# Altium PCB PCB.PcbDoc (part 1 of 3)
Units mm, origin at the board's own origin, x right, y up, seen from the top; angles counter-clockwise.
Board outline 35.13 x 75.01 mm, 4 copper layers (Top Layer, GND_Signal_1, Signal_1, Bottom Layer), stack 1.707 mm thick; 130 components, 99 nets, 648 pads, 871 vias.
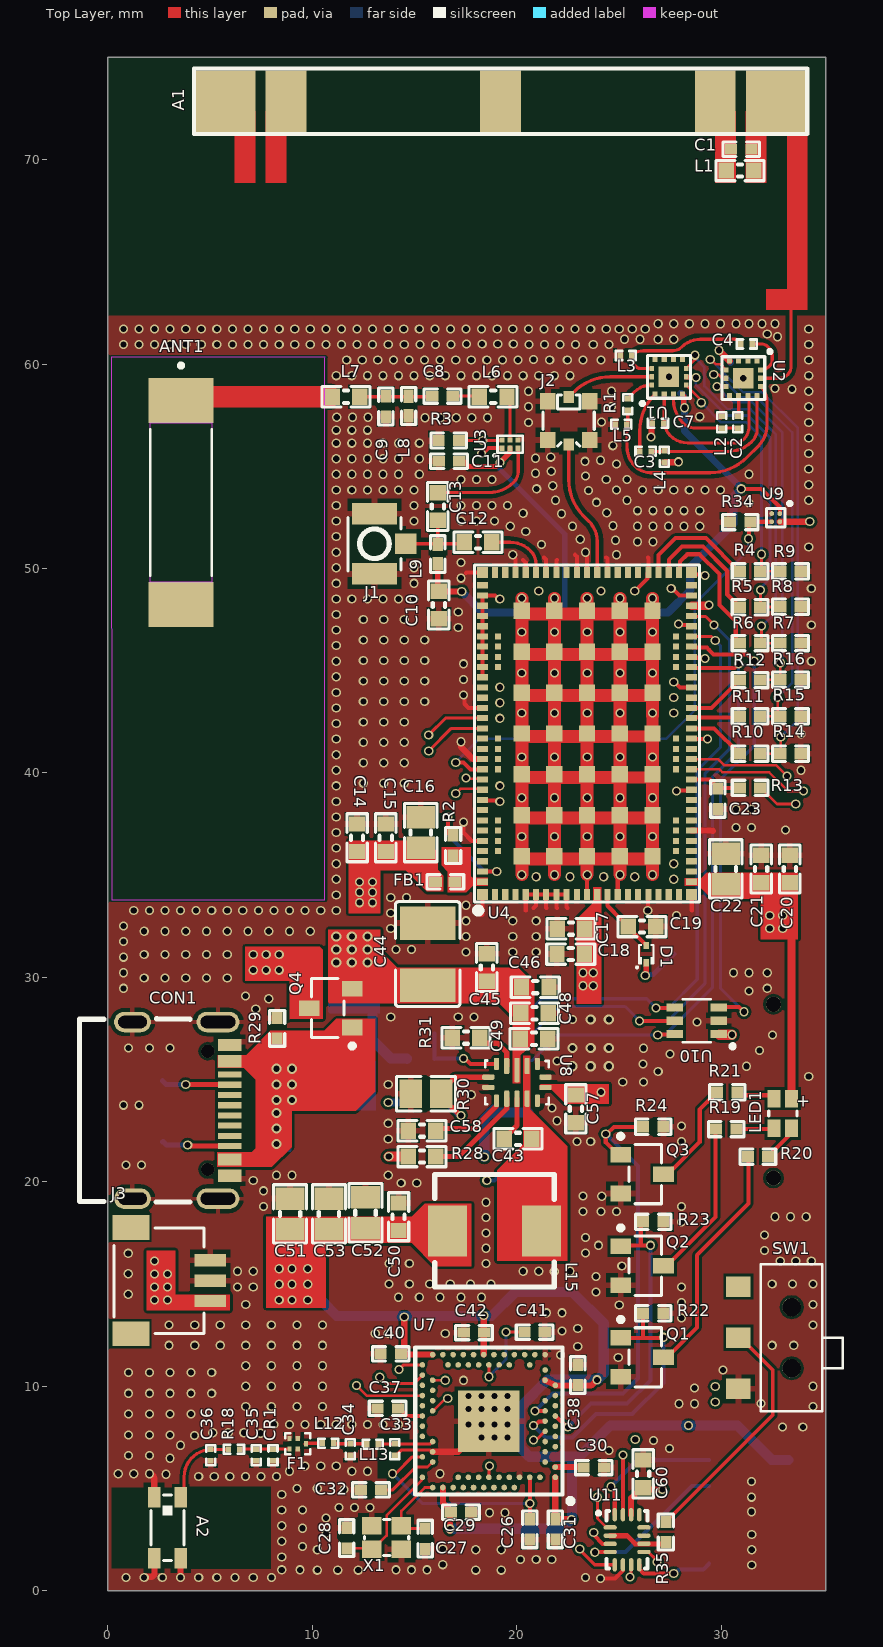
[diagram p0: Top Layer view]
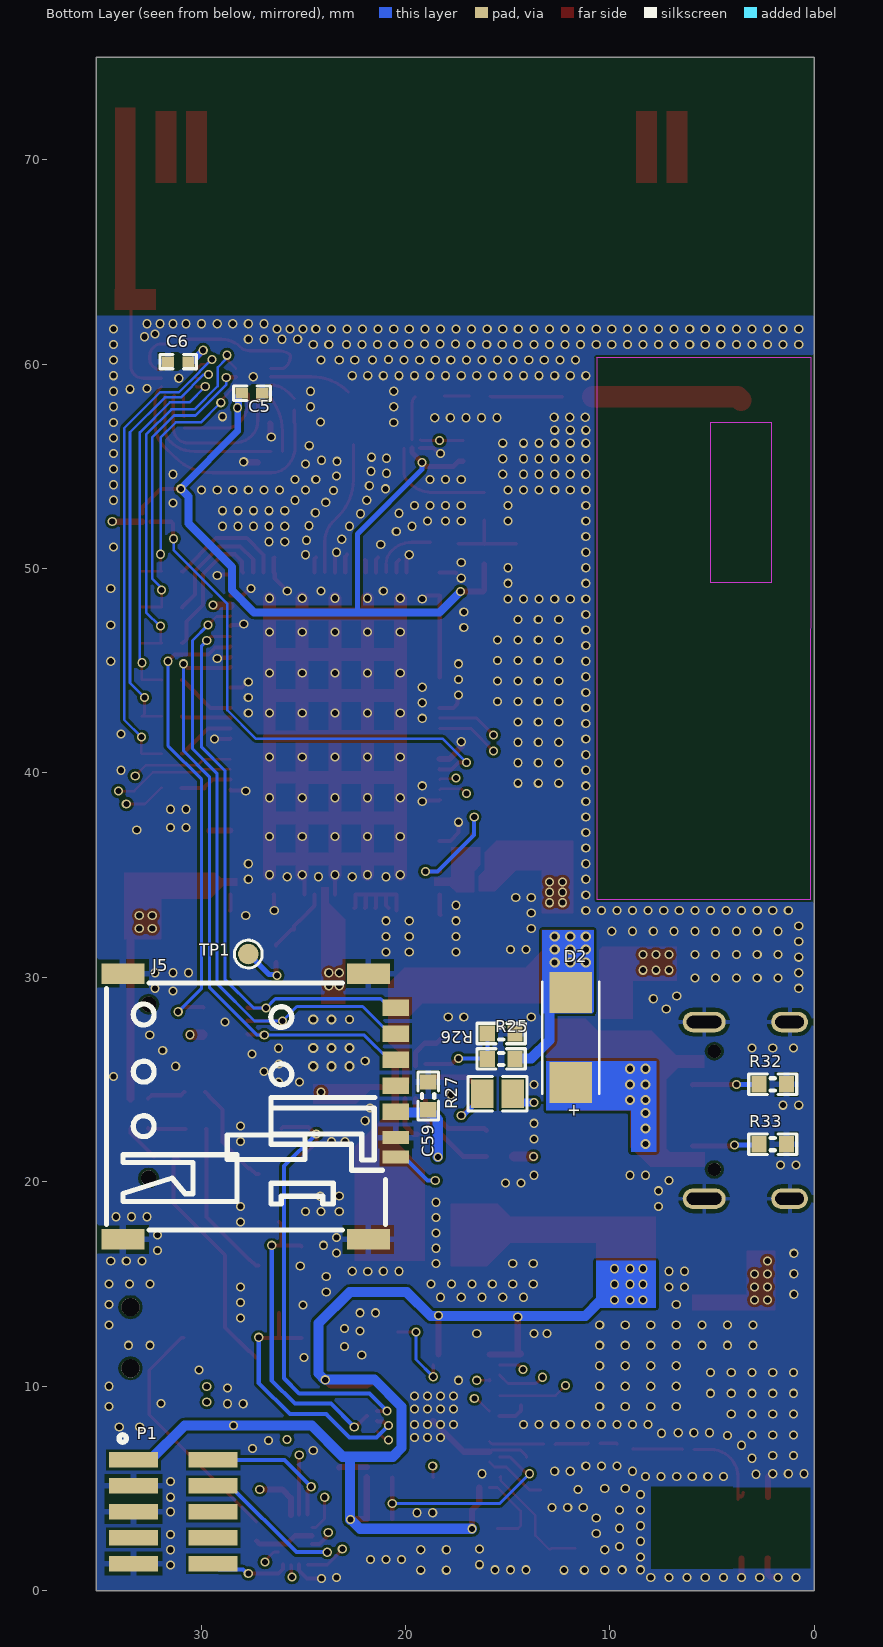
[diagram p1: Bottom Layer view, seen from below]
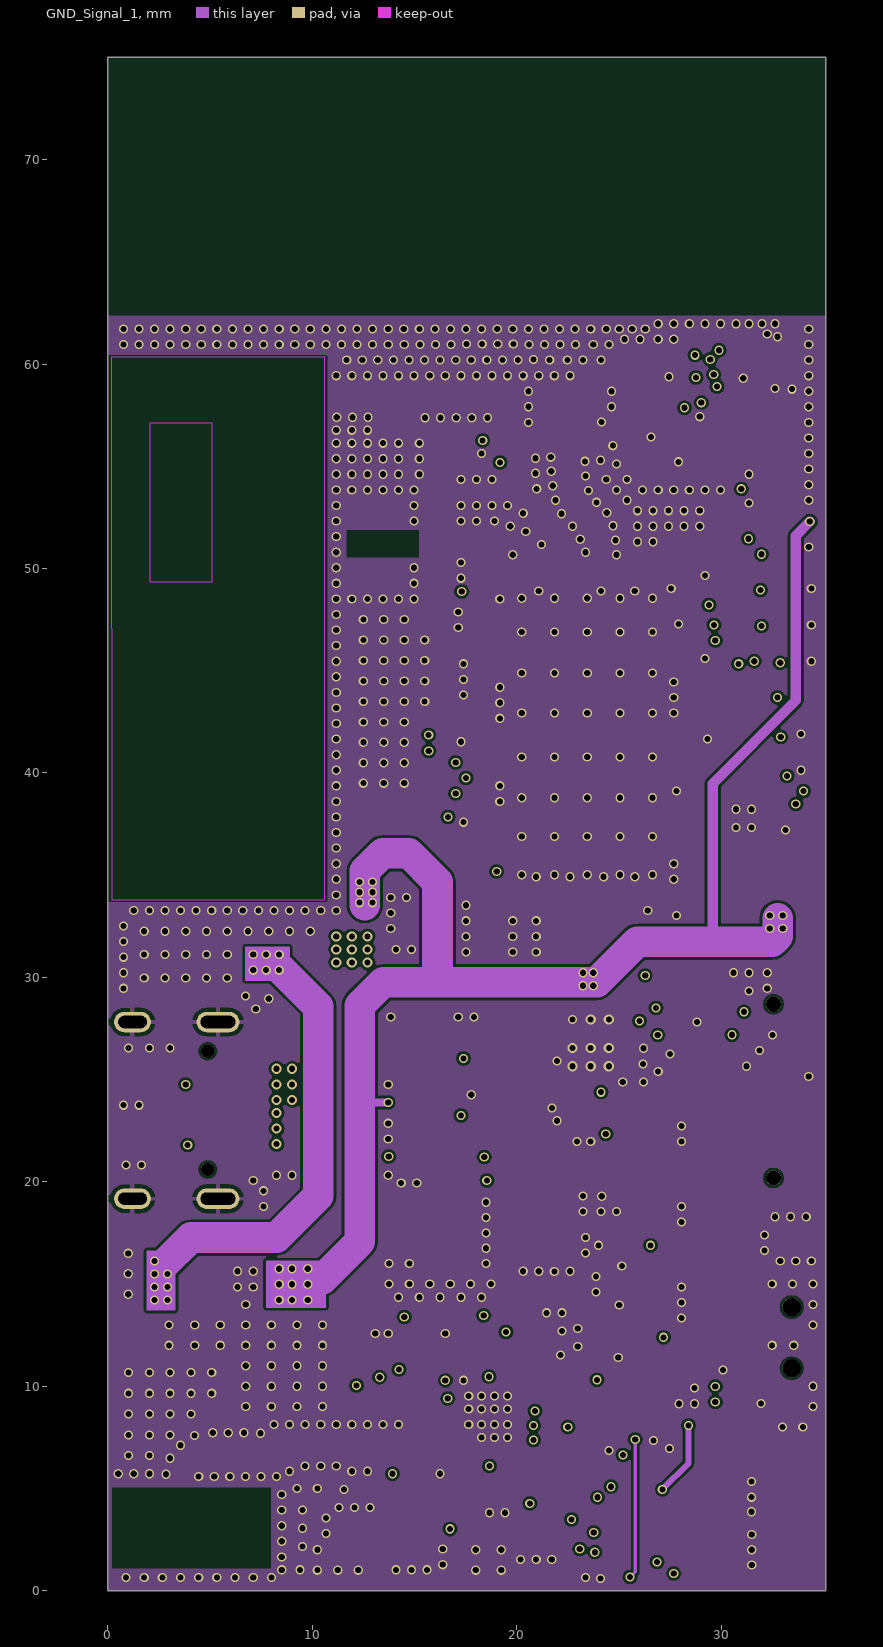
[diagram p2: GND_Signal_1]
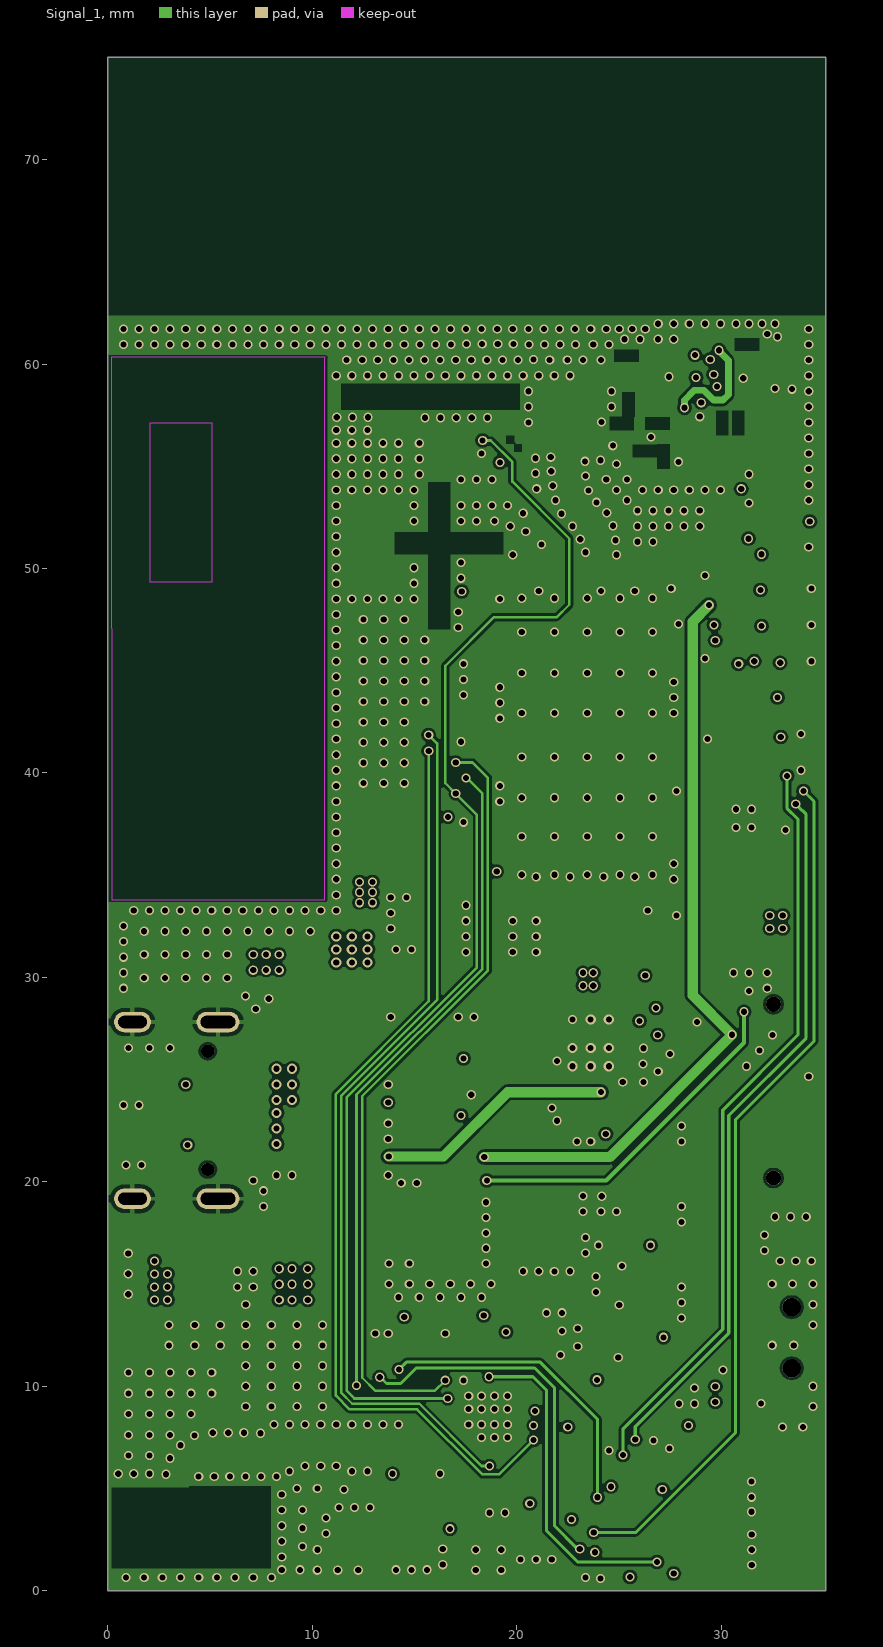
[diagram p3: Signal_1]
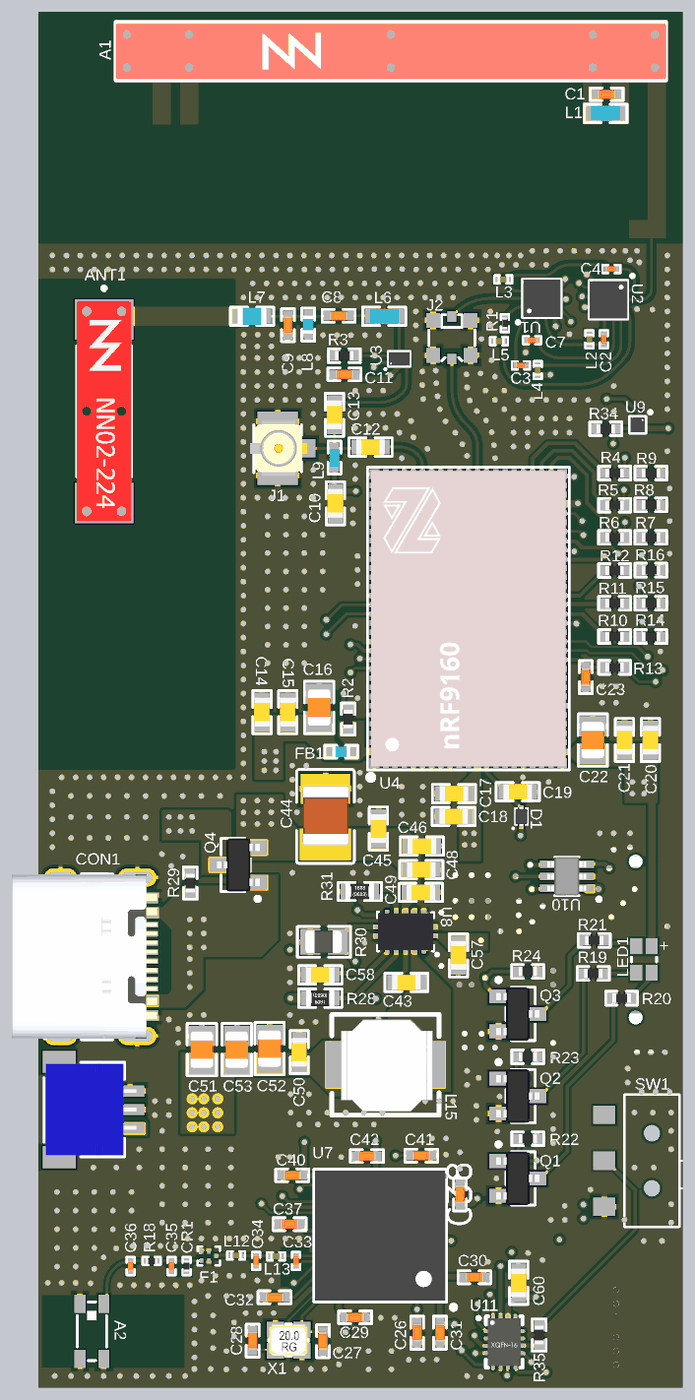
[diagram p5: 3D render of the assembled board from above, using the file's embedded part models]
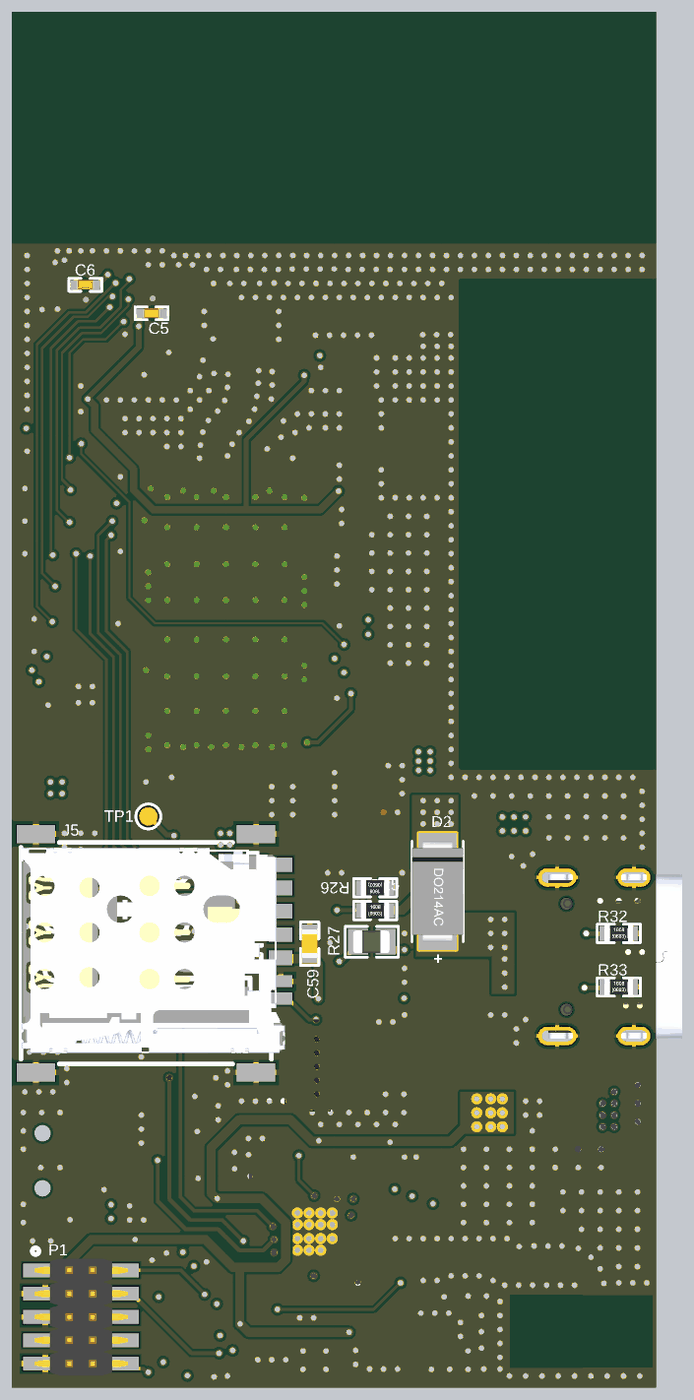
[diagram p6: 3D render of the assembled board from below, using the file's embedded part models]

## Layer stack, top to bottom
Top Solder: solder mask 0.0475, Solder Resist, Dk 3.5
Top Layer: signal copper 0.018
Dielectric 3: prepreg 0.1, Dk 4.2
GND_Signal_1: signal copper 0.0152
Dielectric1: dielectric 0.32, FR-4, Dk 4.8
Signal_1: signal copper 0.0356
Dielectric 1: prepreg 1.2, PP-006, Dk 4.1
Bottom Layer: signal copper 0.018
Bottom Solder: solder mask 0.0475, Solder Resist, Dk 3.5

## Board outline
0,0 0,28.473 0,75.006 35.128,75.006 35.128,0

## Design rules (kind name [scope] priority, off if disabled: settings)
Clearance Polygon_Clearance [InNet('GPS_LNA_IN') or InNet('LTE_RF') or InNet('GPS_RF1') or InNet('T1F') or InNet('T2F')  or InNet('T3F') or InNet('T4F') or InNet('T5F') or InNet('T1A') or InNet('T2A') or InNet('T4A') or InNet('T5A') or InNet('ANT_LTE') or InNet('ANT_GPS') or InNet('GPS_RF3') or InNet('GPS_RF2') or InNet('LTE_RF1')] p1: gap=0.12 ignorepadtopadclearanceinfootprint=FALSE except(0.206: Arc-Fill Arc-Poly Arc-Region Track-Fill Track-Poly Track-Region SMDPad-Fill SMDPad-Poly SMDPad-Region THPad-Fill THPad-Poly THPad-Region Via-Fill Via-Poly Via-Region Fill-Fill Fill-Poly Fill-Region Poly-Poly Poly-Region Region-Region)
Clearance ANT_Clerance [InNet('LTE_RF1') or InNet('LTE_RF') or InNet('T1F') or InNet('T2F') or InNet('T3F') or InNet('T4F') or InNet('T5F') or InNet('T6F') or InNet('T1A') or InNet('T2A') or InNet('T3A') or InNet('T4A') or InNet('T5A') or InNet('T6A') or InNet('T7A') or InNet('ANT_GPS') or InNet('GPS_RF') or InNet('ANT_LTE')  or InNet('LTE_RF') or InNet('BLE_RF') or InNet('nRF52_ANT') or InNet('BLE_ANT') or InNet('GPS_LNA') or InNet('GPS_LNA_IN') vs (InNamedPolygon('Top_Layer-GND')) or (InNamedPolygon('Bottom_Layer-GND'))] p2: gap=0.23 ignorepadtopadclearanceinfootprint=FALSE
Clearance [All] p3: gap=0.125 ignorepadtopadclearanceinfootprint=FALSE except(0.12: Arc-Arc Arc-Track Track-Track)
Clearance "Keepout clearance" [All vs OnLayer('Keep-Out Layer')] p4: gap=0.2 ignorepadtopadclearanceinfootprint=FALSE
ComponentClearance [All] p1 off: gap=0.254 collisioncheckmode=3 verticalgap=0.254 showdistances=FALSE
DiffPairsRouting [All] p1: maxlimit=0.254 minlimit=0.004 mostfreqgap=0.193 toplayer_minwidth=0.15 toplayer_maxwidth=0.165 toplayer_prefwidth=0.165 midlayer1_minwidth=0.15 midlayer1_maxwidth=0.165 midlayer1_prefwidth=0.165 midlayer2_mingap=0.191 midlayer2_minwidth=0.165 midlayer2_maxwidth=0.165 midlayer2_prefwidth=0.165 bottomlayer_mingap=0.191 bottomlayer_minwidth=0.165 bottomlayer_maxwidth=0.165 bottomlayer_prefwidth=0.165 maxuncoupledlength=12.7
FabricationTestPointUsage TestPointUsage [All] p1: valid=0 allowmultiple=FALSE
FabricationTestpoint Testpoint [All] p1: side=3 testpointundercomponent=TRUE minsize=1.016 maxsize=2.54 preferedsize=1.524 minholesize=0 maxholesize=1.016 preferedholesize=0.813 testpointgrid=0.025 allowsidetop=TRUE allowsidebottom=TRUE usegrid=TRUE gridtolerance=0
Height [All] p1 off: minheight=0 maxheight=25.4 prefheight=12.7
HoleSize [All] p1: absolutevalues=TRUE maxlimit=5 minlimit=0.1 maxpercent=80.000 minpercent=20.000
MinimumAnnularRing [All] p1 off: minimumring=0.152
NetAntennae NetAntennae_ANT [InNet('ANT')] p1: netantennaetolerance=40
NetAntennae [All] p2: netantennaetolerance=0
PlaneClearance [All] p1: clearance=0.4
PolygonConnect [InNet('GND')] p1: thpad.connectstyle=Relief thpad.reliefconductorwidth=0.2 thpad.reliefentries=4 thpad.polygonreliefangle="90 Angle" thpad.airgapwidth=0.2 smdpad.connectstyle=Relief smdpad.reliefconductorwidth=0.3 smdpad.reliefentries=4 smdpad.polygonreliefangle="90 Angle" smdpad.airgapwidth=0.2 via.connectstyle=Direct via.reliefconductorwidth=0.254 via.reliefentries=4 via.polygonreliefangle="90 Angle" via.airgapwidth=0.254
PolygonConnect PolygonConnect_1 [InNet('+3V3') vs InNet('+3V3')] p2: connectstyle=Direct reliefconductorwidth=0.254 reliefentries=4 polygonreliefangle="90 Angle" airgapwidth=0.254
RoutingVias [All] p1: holewidth=0.3 width=0.45 viastyle="Through Hole" minholewidth=0.2 minwidth=0.25 maxholewidth=0.4 maxwidth=0.5
ShortCircuit ShortCircuit_AGND/GND [InNet('AGND') vs InNet('GND')] p1: allowed=TRUE
ShortCircuit [All] p2: allowed=FALSE
SilkToSolderMaskClearance SilkscreenOverComponentPads [IsPad] p1: minsilkscreentomaskgap=0.254 clearancetoexposedcopper=TRUE
SolderMaskExpansion SolderMaskExpansion_1 [IsVia] p1: expansion=0.102
SolderMaskExpansion [All] p2: expansion=0.076
UnpouredPolygon [All] p1 off:
Width Width_Diff [(InDifferentialPairClass('All Differential Pairs'))] p1: maxlimit=0.165 minlimit=0.165 preferedwidth=0.165
Width [All] p2: maxlimit=10.16 minlimit=0.125 preferedwidth=0.152 minimp=50.000000 maximp=50.000000 favimp=50.000000
19 further rules are at their usual default settings.

## Classes and differential pairs
component class "Power Input Solar, Battery": C43 C44 C45 C46 C48 C49 C50 C51 C52 C53 C57 C58 CON1 D2 J3 L15 Q4 R25 R26 R27 R28 R29 R30 R31 R32 R33 R34 U8 U9
component class "SWD and SIM Connector": C59 C60 J5 P1 R35 SW1 U10 U11
component class "MCU NRF9160 Cellular GPS": A1 ANT1 C1 C2 C3 C4 C5 C6 C7 C8 C9 C10 C11 C12 C13 C14 C15 C16 C17 C18 C19 C20 C21 C22 C23 D1 FB1 J1 J2 L1 L2 L3 L4 L5 L6 L7 L8 L9 R1 R2 R3 R4 R5 R6 R7 R8 R9 R10 R11 R12 R13 R14 R15 R16 TP1 U1 U2 U3 U4
component class RGB: LED1 Q1 Q2 Q3 R19 R20 R21 R22 R23 R24

## Components (designator, comment, footprint, x,y, rotation, side; value= is the part's Value field where it differs from the comment)
A1 "NN03-310" FR01-S4-210_DF 19.217,72.863 r0 top value=FR01-S4-210
A2 "2450AT18D0100" 2450AT18D0100_STD-R 2.919,3.076 r90 top
ANT1 "NN02-224" ANT-NN02-224 3.581,58.231 r270 top
C1 "0.5pF" CAPC1005X04L 30.986,70.514 r180 top locked
C2 "2.5pF" CAPC0603X03L_C 30.826,57.154 r270 top
C3 "5.5pF" CAPC0603X03L_C 26.305,55.732 r180 top
C4 "9.2pF" CAPC0603X03L_C 31.248,60.985 r180 top
C5 "2.2nF" CAPC1005X04L 27.508,58.572 r180 bottom
C6 "2.2nF" CAPC1005X04L 31.115,60.122 r0 bottom
C7 "1.5pF" CAPC0603X03L_C 26.915,57.103 r180 top
C8 "1nF" CAPC1005X04L 16.37,58.434 r180 top locked
C9 "3.7pF" CAPC1005X04L 13.607,57.926 r270 top locked
C10 "39pF" CAPC1608X06L_3 16.196,48.213 r90 top
C11 "33nF" CAPC1005X04L 16.688,55.245 r0 top
C12 "39pF" CAPC1608X06L_3 18.11,51.283 r180 top
C13 "39pF" CAPC1608X06L_3 16.145,53.039 r90 top
C14 "15pF" CAPC1608X06L_3 12.192,36.83 r90 top
C15 "100nF" CAPC1608X06L_3 13.599,36.83 r90 top
C16 "47uF" CAPC2012X11L 15.305,37.084 r90 top
C17 "100nF" CAPC1608X06L_3 22.657,32.385 r180 top
C18 "4.7uF" CAPC1608X06L_3 22.646,31.14 r180 top
C19 "4.7uF" CAPC1608X06L_3 26.137,32.487 r0 top
C20 "15pF" CAPC1608X06L_3 33.367,35.306 r90 top
C21 "100nF" CAPC1608X06L_3 31.96,35.306 r90 top
C22 "47uF" CAPC2012X11L 30.226,35.306 r90 top
C23 "100nF/16V" CAPC1005X04L 29.845,38.735 r270 top
C26 "1uF" CAPC1005X04L 20.65,2.997 r270 top
C27 "12pF" CAPC1005X04L 15.519,2.54 r270 top
C28 "12pF" CAPC1005X04L 11.684,2.565 r90 top
C29 "100nF" CAPC1005X04L 17.272,3.835 r0 top
C30 "100nF" CAPC1005X04L 23.774,6.02 r0 top
C31 "1uF" CAPC1005X04L 21.895,2.997 r270 top
C32 "100pF" CAPC1005X04L 12.878,4.928 r180 top
C33 "1.0pF" CAPC0603X03L_C 14.046,6.909 r90 top
C34 "1.2pF" CAPC0603X03L_C 11.868,6.909 r90 top value=1.0pF
C35 "DNP" CAPC0603X03L_C 7.261,6.629 r90 top
C36 "DNP" CAPC0603X03L_C 5.029,6.629 r90 top
C37 "820pF" CAPC1005X04L 13.691,8.915 r180 top
C38 "4.7uF" CAPC1005X04L 22.987,10.541 r90 top
C40 "100nF" CAPC1005X04L 13.843,11.582 r180 top
C41 "100nF" CAPC1005X04L 20.879,12.649 r0 top
C42 "100nF" CAPC1005X04L 17.907,12.624 r180 top
C43 "220nF" CAPC1608X06L_3 20.066,22.098 r0 top
C44 "100uF" CAPC3225CX04L 15.748,31.242 r270 top
C45 "10uF" CAPC1608X06L_3 18.542,30.48 r90 top
C46 "10uF" CAPC1608X06L_3 20.909,29.525 r0 top
C48 "4.7uF" CAPC1608X06L_3 20.879,28.245 r180 top
C49 "0.1uF" CAPC1608X06L_3 20.853,27 r180 top
C50 "0.1uF" CAPC1608X06L_3 14.224,18.288 r270 top
C51 "47uF" CAPC2012X11L 8.914,18.429 r270 top
C52 "47uF" CAPC2012X11L 12.606,18.483 r270 top
C53 "47uF" CAPC2012X11L 10.819,18.429 r270 top
C57 "4.7uF" CAPC1608X06L_3 22.9,23.569 r90 top
C58 "22nF" CAPC1608X06L_3 15.367,22.504 r0 top
C59 "100nF" CAPC1608X06L_3 18.89,24.204 r270 bottom
C60 "100nF" CAPC1608X06L_3 26.187,5.715 r90 top
CON1 "HC-TYPE-C-16P-01A-L" CONN_RCP_USB3.1_TYPE-C_16P_SMD_BLUE-HC-TYPE-C-16P-01A-L 3.581,23.495 r270 top locked
CR1 "EZA-EG1N50AC" RESC0603X03L_C 8.081,6.629 r90 top
D1 "NSR0620P2T5G" SODFL100X40-2N 26.34,31.14 r90 top
D2 "SS54" DO-214AC(SMA) 12.014,27.229 r270 bottom
F1 "SAFFB2G45MA0F0A" SAFFB2G45MA0F0A 9.292,7.184 r180 top
FB1 "120R/0.7A" INDC1005X04L 16.51,34.671 r0 top
J1 "U.FL-R-SMT-1(10)" "COAXIAL RF U.FL-R-SMT-1" 13.046,51.211 r90 top
J2 "MM8130-2600RA2" COAXIAL-SWF 22.547,57.235 r180 top
J3 "BATT" CONN_SMD_3P_1mm_SM03B-SRSS-TB 5.004,15.164 r270 top
J5 "SMN-303" XUNPU_SMN-303 27.245,23.063 r270 bottom locked
L1 "15nH" INDC1608X06L_WW 30.926,69.469 r180 top locked
L2 "DNP" INDC0603X03L_C 30.039,57.154 r270 top
L3 "6.2nH" INDC0603X03L_C 25.342,60.422 r0 top
L4 "5.1nH" INDC0603X03L_C 27.229,55.474 r90 top
L5 "4.7nH" INDC0603X03L_C 25.111,57.053 r0 top
L6 "8.2nH" INDC1608X06L_WW 18.852,58.408 r180 top locked
L7 "11nH" INDC1608X06L 11.65,58.408 r0 top locked
L8 "2.4nH" INDC1005X04L_2 14.713,57.951 r90 top locked
L9 "68nH" INDC1005X04L_WW 16.145,50.703 r90 top
L12 "2.2nH" INDC0603X03L_C 10.779,7.214 r180 top value=3.9nH
L13 "4.7nH" INDC0603X03L_C 12.957,7.163 r180 top
L15 "1uH/10A" IND_SMD_5.5X5.9MM 18.923,17.602 r180 top
LED1 "RGB" LED_RGB_0606 33.02,23.343 r180 top
P1 "PROG" Header_SMT_2X5-1.27mm 31.42,3.886 r270 bottom value="Pin Header 2x5"
Q1 "AO3400" SOT-23a 25.09,12.36 r270 top
Q2 "AO3400" SOT-23a 25.09,16.846 r270 top
Q3 "AO3400" SOT-23a 25.09,21.327 r270 top
Q4 "SI2343CDS" SOT-23a 11.955,27.549 r90 top
R1 "0R" RESC0603X03L_C 25.436,58.033 r90 top
R2 "10K" RESC1005X04L 16.891,36.449 r270 top
R3 "100K" RESC1005X04L 16.679,56.265 r0 top
R4 "10K" RESC1005X04L 31.42,49.86 r180 top
R5 "10K" RESC1005X04L 31.42,48.108 r180 top
R6 "10K" RESC1005X04L 31.42,46.355 r180 top
R7 "16K" RESC1005X04L 33.401,46.355 r180 top
R8 "16K" RESC1005X04L 33.401,48.133 r180 top
R9 "16K" RESC1005X04L 33.401,49.86 r180 top
R10 "10K" RESC1005X04L 31.42,40.945 r180 top
R11 "10K" RESC1005X04L 31.42,42.766 r180 top
R12 "10K" RESC1005X04L 31.42,44.544 r180 top
R13 "1K" RESC1005X04L 31.42,39.268 r180 top
R14 "16K" RESC1005X04L 33.401,40.945 r180 top
R15 "16K" RESC1005X04L 33.401,42.766 r180 top
R16 "16K" RESC1005X04L 33.401,44.57 r180 top
R18 "0R" RESC0603X03L_C 6.172,6.909 r180 top
R19 "200R" RESC1005X04L 30.251,22.581 r0 top
R20 "300R" RESC1005X04L 31.801,21.234 r0 top
R21 "200R" RESC1005X04L 30.302,24.384 r0 top
R22 "100K" RESC1005X04L 26.682,13.569 r180 top
R23 "100K" RESC1005X04L 26.682,18.04 r180 top
R24 "100K" RESC1005X04L 26.682,22.688 r180 top
R25 "100K" RESC1608X03L_C_2 15.443,26.01 r180 bottom
R26 "100K" RESC1608X03L_C_2 15.189,27.254 r0 bottom
R27 "90K" RESC2012X11L 15.494,24.308 r180 bottom
R28 "3.3K" RESC1608X03L_C_2 15.494,21.234 r180 top
R29 "100K" RESC1005X04L 8.28,27.508 r270 top
R30 "20K" RESC2012X11L 15.57,24.308 r0 top
R31 "4.99K" RESC1608X03L_C_2 17.399,27.051 r0 top
R32 "5.1k" RESC1608X03L_C_2 2.159,24.765 r180 bottom
R33 "5.1k" RESC1608X03L_C_2 2.159,21.844 r180 bottom
R34 "100K" RESC1005X04L 30.937,52.273 r0 top
R35 "100K" RESC1005X04L 27.305,2.87 r270 top
SW1 "K3-1280S-F1" K3-1280S-F1 32.152,12.371 r90 top
TP1 "Ø1.0mm,SMD" TP_SMD_Ø1.0mm 27.686,31.14 r180 bottom
U1 "SKY13418-485LF" UFQFN40P200X200X65_HS-15N 27.448,59.38 r90 top
U2 "SKY13418-485LF" UFQFN40P200X200X65_HS-15N 31.087,59.311 r270 top
U3 "BGA524N6" XFDFN40P100X55-6N 19.676,56.087 r90 top
U4 "nRF9160-SICAB1A" LGA50P1600X1050X104-161N 23.444,41.93 r90 top
U7 "nRF52840" AQFN50P700X700X85_HS-74N 18.641,8.293 r180 top locked
U8 "TPS54J061RPGR" VQFN-14_2MMX3MM 20.015,24.867 r270 top locked
U9 "TCK106AG" BGA4C40P2X2_76X76X62 32.674,52.492 r270 top
U10 "SMF05C.TCT" SOT65P210X110-6N 29.04,28.387 r180 top
U11 "FSA2466UMX" XQFN40P180X260X50-16N 25.4,2.489 r0 top
X1 "32MHz" BT-XTAL_2016 13.64,2.591 r0 top

## Footprints (in the part's own frame and the unit in brackets; to place one, negate y for a bottom-side part, rotate by r counter-clockwise, add the part's x,y. Pads: shape width x height; smd on the part's side, far side on the other; paste and mask are expansions set on the pad)
2450AT18D0100_STD-R [mm]
  rect 1x0.6 smd mask+0.051: 1(1.5,-0.65) 2(-1.5,-0.65) 2(-1.5,0.65) 2(1.5,0.65)
  Top Layer pour cut-out: 2,-5.05 2,-1.067 -2,-1.067 -2,-5.05
  Signal_1 pour cut-out: 2.025,-5.05 2.025,-1.067 -1.975,-1.067 -1.975,-5.05
  Bottom Layer pour cut-out: 2,-5.05 2,-1.067 -2,-1.067 -2,-5.05
  silkscreen extent -1.6,-0.8 1.6,0.8, body extent -1.61,-0.8 1.6,0.81, height 1.2
ANT-NN02-224 [mm]
  rect 2.2x3.2 smd: 1(0,0) 2(10,0)
  Keep-Out Layer region: 8.9,-1.5 1.1,-1.5 1.1,1.5 8.9,1.5
  Keep-Out Layer region: 8.9,-1.5 1.1,-1.5 1.1,1.5 8.9,1.5
  silkscreen extent -1.8,-1.5 8.59,1.5, body extent -1,-1.5 11,1.5, height 2.41
AQFN50P700X700X85_HS-74N [mm]
  rect 3x3 smd mask+0.05: 74(0,0)
  round 0.275 smd paste+0.012 mask+0.05: A8(-1.25,3.25) A10(-0.75,3.25) A12(-0.25,3.25) A14(0.25,3.25) A16(0.75,3.25) A18(1.25,3.25) A20(1.75,3.25) A22(2.25,3.25) A23(2.75,3.25) AA24(3.25,-2.25) AB2(-2.75,-2.5) AC5(-2,-2.75) AC9(-1,-2.75) AC11(-0.5,-2.75) AC13(0,-2.75) AC15(0.5,-2.75) AC17(1,-2.75) AC19(1.5,-2.75) AC21(2,-2.75) AC24(3.25,-2.75) AD2(-2.75,-3.25) AD4(-2.25,-3.25) AD6(-1.75,-3.25) AD8(-1.25,-3.25) AD10(-0.75,-3.25) AD12(-0.25,-3.25) AD14(0.25,-3.25) AD16(0.75,-3.25) AD18(1.25,-3.25) AD20(1.75,-3.25) AD22(2.25,-3.25) AD23(2.75,-3.25) B1(-3.25,2.75) B3(-2.5,2.75) B5(-2,2.75) B7(-1.5,2.75) B9(-1,2.75) B11(-0.5,2.75) B13(0,2.75) B15(0.5,2.75) B17(1,2.75) B19(1.5,2.75) B24(3.25,2.75) C1(-3.25,2.25) D2(-2.75,2) D23(2.75,2) E24(3.25,1.75) F2(-2.75,1.5) F23(2.75,1.5) G1(-3.25,1.25) H2(-2.75,1) H23(2.75,1) J1(-3.25,0.75) J24(3.25,0.75) K2(-2.75,0.5) L1(-3.25,0.25) L24(3.25,0.25) M2(-2.75,0) N1(-3.25,-0.25) N24(3.25,-0.25) P2(-2.75,-0.5) P23(2.75,-0.5) R1(-3.25,-0.75) R24(3.25,-0.75) T2(-2.75,-1) T23(2.75,-1) U1(-3.25,-1.25) U24(3.25,-1.25) V23(2.75,-1.5) W1(-3.25,-1.75) W24(3.25,-1.75) Y2(-2.75,-2) Y23(2.75,-2)
  silkscreen extent -4.11,-3.6 3.6,4.04, body extent -3.55,-3.55 3.55,3.55, height 0.85
BGA4C40P2X2_76X76X62 [mm]
  round 0.235 smd mask+0.05: A1(-0.2,0.2) A2(0.2,0.2) B1(-0.2,-0.2) B2(0.2,-0.2)
  silkscreen extent -0.74,-0.45 0.45,0.74, body extent -0.39,-0.39 0.4,0.4, height 0.55
BT-XTAL_2016 [mm]
  rect 0.95x0.85 smd: 1(-0.725,-0.575) 2(0.725,-0.575) 3(0.725,0.575) 4(-0.725,0.575)
  silkscreen extent -1.08,-0.88 1.08,0.88, body extent -1.05,-0.85 1.05,0.85, height 0.56
CAPC0603X03L_C [mm]
  rect 0.27x0.3 smd mask+0.025: 1(-0.285,0) 2(0.285,0)
  silkscreen extent -0.49,-0.22 0.49,0.22, body extent -0.3,-0.15 0.31,0.15, height 0.3
CAPC1005X04L [mm]
  rect 0.6x0.5 smd mask+0.025: 1(-0.5,0) 2(0.5,0)
  silkscreen extent -0.9,-0.35 0.9,0.35, body extent -0.51,-0.25 0.51,0.25, height 0.5
CAPC1608X06L_3 [mm]
  rect 0.75x0.8 smd mask+0.025: 1(-0.675,0) 2(0.675,0)
  silkscreen extent -1.17,-0.5 1.17,0.5, body extent -0.8,-0.43 0.8,0.43, height 0.8
CAPC2012X11L [mm]
  rect 1.1x1.4 smd mask+0.025: 1(-0.75,0) 2(0.75,0)
  silkscreen extent -1.43,-0.8 1.42,0.8, body extent -1,-0.62 1,0.63, height 0.77
CAPC3225CX04L [mm]
  rect 1.635x2.7 smd paste-100 mask+0.051: 1(-1.416,-0.098) 2(1.619,-0.098)
  silkscreen extent -2.46,-1.68 2.67,1.48, body extent -1.55,-1.33 1.65,1.17, height 2.7
"COAXIAL RF U.FL-R-SMT-1" [mm]
  rect 1x1.05 smd: 1(0,-1.525)
  rect 1.05x2.2 smd: 2(-1.475,0) 2(1.475,0)
  Top Layer pour cut-out: 0.85,1.3 -0.85,1.3 -0.85,-1.525 0.85,-1.525
  silkscreen extent -1.32,-1.3 1.28,1.3, body extent -1.5,-1.6 1.5,1.5, height 1.25
COAXIAL-SWF [mm]
  rect 0.5x0.58 smd: 1(0,1.16) 3(0,-1.16)
  rect 0.75x0.8 smd: 2(-1.025,0.95) 2(-1.025,-0.95) 2(1.025,0.95) 2(1.025,-0.95)
  Top Layer pour cut-out: -0.65,0.55 0.65,0.55 0.65,1.35 -0.65,1.35
  Top Layer pour cut-out: 0.65,-0.55 -0.65,-0.55 -0.65,-1.35 0.65,-1.35
  silkscreen extent -1.25,-1.25 1.25,1.25, body extent -1.26,-1.3 1.26,1.3, height 1.55
CONN_RCP_USB3.1_TYPE-C_16P_SMD_BLUE-HC-TYPE-C-16P-01A-L [mm]
  rect 0.3x1.15 smd mask+0.04: A1(-3.35,2.373) A4(-2.55,2.373) A5(-1.25,2.373) A6(-0.25,2.373) A7(0.25,2.373) A8(1.25,2.373) A9(2.55,2.373) A12(3.35,2.373) B1(3.05,2.373) B4(2.25,2.373) B5(1.75,2.373) B6(0.75,2.373) B7(-0.75,2.373) B8(-1.75,2.373) B9(-2.25,2.373) B12(-3.05,2.373)
  oval 1x2.1 hole 0.6 slot 1.7 at 90 deg: S1(-4.32,1.807) S3(4.32,1.807)
  oval 1x1.8 hole 0.6 slot 1.4 at 90 deg: S2(-4.32,-2.373) S4(4.32,-2.373)
  round 0.65 hole 0.65 unplated mask+0.04: ""(-2.89,1.308) ""(2.89,1.308)
  silkscreen extent -4.48,-4.97 4.48,0.44, body extent -4.48,-5.01 4.46,2.9, height 3.31
CONN_SMD_3P_1mm_SM03B-SRSS-TB [mm]
  rect 1.2x1.8 smd: 0(-2.6,-3.875) 0(2.6,-3.875)
  rect 0.6x1.55 smd: 1(-1,0) 2(0,0) 3(1,0)
  silkscreen extent -2.57,-4.7 2.58,-0.3, body extent -2.5,-4.61 2.5,0.34, height 2.95
DO-214AC(SMA) [mm]
  rect 2x2.1 smd: 1(2.378,0.102) 2(-2.022,0.102)
  silkscreen extent -2.57,-1.3 2.92,1.5, body extent -2.57,-1.3 2.92,1.5, height 2.29
FR01-S4-210_DF [mm]
  rect 2x3 smd: 0(0,0) 2(10.5,0) 4(-10.5,0)
  rect 3x3 smd: 1(13.5,0) 3(-13.5,0)
  Top Layer region: 15,-10.211 15,-0.312 14,-0.312 14,-10.211
  Top Layer region: 15,-9.2 15,-10.211 13,-10.211 13,-9.2
  Top Layer pour cut-out: -19.025,2 15.4,2 15.4,-10.5 -19.025,-10.5
  Top Layer region: -10.5,-0.5 -11.5,-0.5 -11.5,-4 -10.5,-4
  Top Layer region: -12,-0.5 -13,-0.5 -13,-4 -12,-4
  Top Layer region: 11.5,-0.5 10.5,-0.5 10.5,-4 11.5,-4
  Top Layer region: 13,-0.5 12,-0.5 12,-4 13,-4
  GND_Signal_1 pour cut-out: -19.075,2 15.4,2 15.4,-10.5 -19.075,-10.5
  Signal_1 pour cut-out: -19.101,2 15.4,2 15.4,-10.5 -19.101,-10.5
  Bottom Layer pour cut-out: -19.075,2 15.4,2 15.4,-10.5 -19.075,-10.5
  silkscreen extent -15,-1.6 15,1.6, body extent -15,-1.5 15,1.5, height 1
Header_SMT_2X5-1.27mm [mm]
  rect 0.75x2.4 smd: 1(-2.509,-1.886) 2(-2.509,2.014) 3(-1.239,-1.886) 4(-1.239,2.014) 5(0.031,-1.886) 6(0.031,2.014) 7(1.301,-1.886) 8(1.301,2.014) 9(2.571,-1.886) 10(2.571,2.014)
  silkscreen extent -3.74,-2.59 -3.38,-2.23, body extent -3.14,-2.49 3.21,2.61, height 5.9
IND_SMD_5.5X5.9MM [mm]
  rect 1.9x2.5 smd paste+0 mask+0.05: 1(-2.3,0) 2(2.3,0)
  silkscreen extent -2.92,-2.75 2.92,2.75, body extent -2.58,-2.46 2.42,2.54, height 2
INDC0603X03L_C [mm]
  rect 0.27x0.3 smd: 1(-0.285,0) 2(0.285,0)
  silkscreen extent -0.49,-0.22 0.49,0.22, body extent -0.31,-0.16 0.31,0.16, height 0.26
INDC1005X04L [mm]
  rect 0.65x0.5 smd: 1(-0.475,0) 2(0.475,0)
  silkscreen extent -0.9,-0.35 0.9,0.35, body extent -0.5,-0.3 0.5,0.3, height 0.5
INDC1005X04L_2 [mm]
  rect 0.65x0.5 smd: 1(-0.475,0) 2(0.475,0)
  silkscreen extent -0.9,-0.35 0.9,0.35, body extent -0.5,-0.3 0.5,0.3, height 0.5
INDC1005X04L_WW [mm]
  rect 0.65x0.5 smd: 1(-0.475,0) 2(0.475,0)
  silkscreen extent -0.9,-0.35 0.9,0.35, body extent -0.5,-0.3 0.5,0.3, height 0.51
INDC1608X06L [mm]
  rect 0.75x0.8 smd: 1(-0.675,0) 2(0.675,0)
  silkscreen extent -1.17,-0.5 1.17,0.5, body extent -0.8,-0.48 0.8,0.48, height 0.8
INDC1608X06L_WW [mm]
  rect 0.75x0.8 smd: 1(-0.675,0) 2(0.675,0)
  silkscreen extent -1.17,-0.5 1.17,0.5, body extent -0.8,-0.45 0.8,0.45, height 0.81
K3-1280S-F1 [mm]
  rect 1x1.2 smd paste+0 mask+0.05: 1(-2.5,1.3) 2(0,1.3) 3(2.5,1.3)
  round 0.9 hole 0.9 unplated paste+0: ""(-1.5,-1.3) ""(1.5,-1.3)
  silkscreen extent -3.6,-3.8 3.6,0.2
LED_RGB_0606 [mm]
  rect 0.65x0.85 smd paste+0 mask+0.01: 1(-0.425,0.725) 2(0.425,0.725) 3(0.425,-0.725) 4(-0.425,-0.725)
  silkscreen extent -0.69,-0.13 0.69,0.13, body extent -0.75,-0.8 0.75,0.8, height 0.35
LGA50P1600X1050X104-161N [mm]
  rect 0.54x0.54 smd mask+0.05: 1(-7.87,5.12) 21(-7.87,-5.12) 52(7.87,-5.12) 72(7.87,5.12)
  rect 0.54x0.3 smd mask+0.05: 2(-7.87,4.5) 3(-7.87,4) 4(-7.87,3.5) 5(-7.87,3) 6(-7.87,2.5) 7(-7.87,2) 8(-7.87,1.5) 9(-7.87,1) 10(-7.87,0.5) 11(-7.87,0) 12(-7.87,-0.5) 13(-7.87,-1) 14(-7.87,-1.5) 15(-7.87,-2) 16(-7.87,-2.5) 17(-7.87,-3) 18(-7.87,-3.5) 19(-7.87,-4) 20(-7.87,-4.5) 53(7.87,-4.5) 54(7.87,-4) 55(7.87,-3.5) 56(7.87,-3) 57(7.87,-2.5) 58(7.87,-2) 59(7.87,-1.5) 60(7.87,-1) 61(7.87,-0.5) 62(7.87,0) 63(7.87,0.5) 64(7.87,1) 65(7.87,1.5) 66(7.87,2) 67(7.87,2.5) 68(7.87,3) 69(7.87,3.5) 70(7.87,4) 71(7.87,4.5)
  rect 0.3x0.54 smd mask+0.05: 22(-7.25,-5.12) 23(-6.75,-5.12) 24(-6.25,-5.12) 25(-5.75,-5.12) 26(-5.25,-5.12) 27(-4.75,-5.12) 28(-4.25,-5.12) 29(-3.75,-5.12) 30(-3.25,-5.12) 31(-2.75,-5.12) 32(-2.25,-5.12) 33(-1.75,-5.12) 34(-1.25,-5.12) 35(-0.75,-5.12) 36(-0.25,-5.12) 37(0.25,-5.12) 38(0.75,-5.12) 39(1.25,-5.12) 40(1.75,-5.12) 41(2.25,-5.12) 42(2.75,-5.12) 43(3.25,-5.12) 44(3.75,-5.12) 45(4.25,-5.12) 46(4.75,-5.12) 47(5.25,-5.12) 48(5.75,-5.12) 49(6.25,-5.12) 50(6.75,-5.12) 51(7.25,-5.12) 73(7.25,5.12) 74(6.75,5.12) 75(6.25,5.12) 76(5.75,5.12) 77(5.25,5.12) 78(4.75,5.12) 79(4.25,5.12) 80(3.75,5.12) 81(3.25,5.12) 82(2.75,5.12) 83(2.25,5.12) 84(1.75,5.12) 85(1.25,5.12) 86(0.75,5.12) 87(0.25,5.12) 88(-0.25,5.12) 89(-0.75,5.12) 90(-1.25,5.12) 91(-1.75,5.12) 92(-2.25,5.12) 93(-2.75,5.12) 94(-3.25,5.12) 95(-3.75,5.12) 96(-4.25,5.12) 97(-4.75,5.12) 98(-5.25,5.12) 99(-5.75,5.12) 100(-6.25,5.12) 101(-6.75,5.12) 102(-7.25,5.12)
  rect 0.8x0.8 smd mask+0.05: 103(-6,-3.2) 103(-6,-1.6) 103(-6,0) 103(-6,1.6) 103(-6,3.2) 103(-4,-3.2) 103(-4,-1.6) 103(-4,0) 103(-4,1.6) 103(-4,3.2) 103(-2,3.2) 103(-2,-1.6) 103(-2,0) 103(-2,1.6) 103(-2,-3.2) 103(0,3.2) 103(0,1.6) 103(0,0) 103(0,-1.6) 103(0,-3.2) 103(2,3.2) 103(2,-1.6) 103(2,0) 103(2,1.6) 103(2,-3.2) 103(4,-3.2) 103(4,-1.6) 103(4,0) 103(4,1.6) 103(4,3.2) 103(6,-3.2) 103(6,-1.6) 103(6,0) 103(6,1.6) 103(6,3.2)
  rect 0.3x0.3 smd mask+0.05: 104(-5.75,-4.35) 105(-5.25,-4.35) 106(-4.75,-4.35) 107(-4.25,-4.35) 108(-1.75,-4.35) 109(-1.25,-4.35) 110(-0.75,-4.35) 111(-0.25,-4.35) 112(3.25,-4.35) 113(3.75,-4.35) 114(4.25,-4.35) 115(4.75,-4.35) 116(4.75,4.35) 117(4.25,4.35) 118(3.75,4.35) 119(3.25,4.35) 120(-0.25,4.35) 121(-0.75,4.35) 122(-1.25,4.35) 123(-1.75,4.35) 124(-4.25,4.35) 125(-4.75,4.35) 126(-5.25,4.35) 127(-5.75,4.35)
  Top Layer pour cut-out: -8.15,5.4 8.15,5.4 8.15,-5.4 -8.15,-5.4
  silkscreen extent -8.81,-5.5 8.25,5.5, body extent -8.05,-5.3 8.05,5.3, height 1.2
RESC0603X03L_C [mm]
  rect 0.27x0.3 smd: 1(-0.285,0) 2(0.285,0)
  silkscreen extent -0.49,-0.22 0.49,0.22, body extent -0.3,-0.15 0.3,0.15, height 0.23
RESC1005X04L [mm]
  rect 0.6x0.55 smd: 1(-0.5,0) 2(0.5,0)
  silkscreen extent -0.87,-0.38 0.88,0.38, body extent -0.5,-0.25 0.5,0.25, height 0.3
RESC1608X03L_C_2 [mm]
  rect 0.75x0.8 smd mask+0.025: 1(-0.548,0) 2(0.802,0)
  silkscreen extent -1.05,-0.5 1.3,0.5, body extent -0.65,-0.43 0.9,0.42, height 0.45
RESC2012X11L [mm]
  rect 1.1x1.4 smd mask+0.025: 1(-0.75,0) 2(0.75,0)
  silkscreen extent -1.45,-0.84 1.45,0.84, body extent -1.03,-0.62 0.97,0.63, height 0.8
SAFFB2G45MA0F0A [mm]
  rect 0.2x0.25 smd mask+0.04: 1(-0.4,0) 2(0,-0.25) 3(0.4,-0.25) 4(0.4,0.25) 5(0,0.25)
  silkscreen extent -0.61,-0.51 0.61,0.51, body extent -0.55,-0.45 0.55,0.45, height 0.5
SODFL100X40-2N [mm]
  rect 0.36x0.25 smd: 1(-0.42,0) 2(0.42,0)
  silkscreen extent -0.7,-0.35 0.5,0.5, body extent -0.5,-0.32 0.5,0.32, height 0.4
SOT65P210X110-6N [mm]
  rect 0.8x0.4 smd: 1(-0.846,1.158) 2(-0.846,0.508) 3(-0.846,-0.142) 4(1.304,-0.142) 5(1.304,0.508) 6(1.304,1.158)
  silkscreen extent -1.62,-0.54 0.9,1.86, body extent -0.82,-0.54 1.28,1.56, height 1.1
SOT-23a [mil]
  rect 30x40 smd: 1(0,0) 2(74.8,0) 3(37.4,82.68)
  silkscreen extent -39,-4 94,79, body extent -20,-5 95,87, height 39
TP_SMD_Ø1.0mm [mm]
  round 1 smd paste-5: 1(0,0)
  silkscreen extent -0.68,-0.68 0.68,0.68
UFQFN40P200X200X65_HS-15N [mm]
  rect 0.23x0.25 smd paste-1 mask+0.06: 1(-0.845,0.675) 2(-0.845,0.225) 3(-0.845,-0.225) 4(-0.845,-0.675) 8(0.845,-0.675) 9(0.845,-0.225) 10(0.845,0.225) 11(0.845,0.675)
  rect 0.25x0.23 smd paste-1 mask+0.06: 5(-0.4,-0.845) 6(0,-0.845) 7(0.4,-0.845) 12(0.4,0.845) 13(0,0.845) 14(-0.4,0.845)
  rect 1x1 smd paste-1 mask+0.06: 15(0,0)
  oval 0.23x0.25 on Top Paste: ""(-0.845,0.225) ""(-0.845,-0.675) ""(-0.845,-0.225) ""(-0.845,0.675) ""(0.845,-0.675) ""(0.845,-0.225) ""(0.845,0.225) ""(0.845,0.675)
  oval 0.25x0.23 on Top Paste: ""(-0.4,0.845) ""(-0.4,-0.845) ""(0,0.845) ""(0,-0.845) ""(0.4,0.845) ""(0.4,-0.845)
  rrect50% 0.85x0.85 on Top Paste: ""(0,0)
  silkscreen extent -1.37,-1.05 1.05,1.37, body extent -1.02,-1.02 1.03,1.03, height 0.65
VQFN-14_2MMX3MM [mm]
  rrect50% 0.6x0.25 smd: 1(-0.9,1) 5(-0.9,-1) 8(0.9,-1) 12(0.9,1)
  rrect50% 0.8x0.25 smd: 2(-0.8,0.5) 4(-0.8,-0.5) 9(0.8,-0.5) 10(0.8,0) 11(0.8,0.5)
  rrect50% 1.2x0.25 smd: 3(-0.6,0)
  rrect50% 0.25x0.6 smd: 6(-0.25,-1.4) 7(0.25,-1.4) 13(0.25,1.4) 14(-0.25,1.4)
  silkscreen extent -1.07,-1.55 1.07,1.55, body extent -1,-1.5 1,1.5, height 1
XFDFN40P100X55-6N [mm]
  rect 0.25x0.25 smd mask+0.05: 1(-0.2,0.4) 2(-0.2,0) 3(-0.2,-0.4) 4(0.2,-0.4) 5(0.2,0) 6(0.2,0.4)
  silkscreen extent -0.61,-0.61 0.41,0.81, body extent -0.38,-0.58 0.38,0.58, height 0.4
XQFN40P180X260X50-16N [mm]
  oval 0.65x0.22 smd paste-0.02 mask+0.04: 1(-0.825,0.6) 2(-0.825,0.2) 3(-0.825,-0.2) 4(-0.825,-0.6) 9(0.825,-0.6) 10(0.825,-0.2) 11(0.825,0.2) 12(0.825,0.6)
  oval 0.22x0.65 smd paste-0.02 mask+0.04: 5(-0.6,-1.225) 6(-0.2,-1.225) 7(0.2,-1.225) 8(0.6,-1.225) 13(0.6,1.225) 14(0.2,1.225) 15(-0.2,1.225) 16(-0.6,1.225)
  silkscreen extent -1.45,-1.4 1,1.4, body extent -0.91,-1.31 0.91,1.31, height 0.55
XUNPU_SMN-303 [mm]
  rect 0.8x1.3 smd paste+0 mask+0.051: C1(-0.37,6.774) C2(-2.91,6.774) C3(-5.45,6.774) C6(-1.64,6.774) C7(-4.18,6.774)
  rect 0.65x1.3 smd paste+0 mask+0.051: C5(0.9,6.774) CD(1.85,6.774)
  rect 1x2.1 smd paste+0 mask+0.051: S1(-7.12,-6.57) S2(5.88,-6.57) S3(5.88,5.43) S4(-7.12,5.43)
  round 0.75 hole 0.75 unplated paste+0: ""(-5.62,-5.32) ""(2.88,-5.32)
  silkscreen extent -6.66,-7.38 5.42,6.27, body extent -6.38,-7.35 4.82,7, height 1.2

## Part data
A1: "Mobile IoT LTE Multi-Band Antenna", Digikey Part Number=2115-NN03-310CT-ND, LCSC="Non Stock", Manufacturer="Fractus Antennas", Manufacturer Part Number=FR01-S4-210, Part Number=FR01-S4-210-D, Part number IPS=80000001819, Supplier Part Number 1=N.A., Artikkelnr Noca=N.A., Component Class=Antennas, ComponentLink1Description=Datasheet, ComponentLink1URL=https://www.fractusantennas.com/wp-content/uploads/2018/01/DS_FR01-S4-210.pdf, ComponentLink2Description="Supplier link", ComponentLink2URL=https://www.fractusantennas.com/trio-mxtend-mobile-iot-antenna/, Footprint Doc=FR01-S4-210, HelpURL=https://www.fractusantennas.com/wp-content/uploads/2018/02/UM_FR01-S4-210.pdf, LatestRevisionDate=2018-07-09, Note=N.A., Pad Count=5, PartId=100700054, Published=2018-07-09, Supplier 1=N.A., Supplier 2=N.A., Supplier Part Number 2=N.A.
A2: library part "Johanson 2450AT18D0100_STD-R", "2.45 GHz chip antenna", Digikey Part Number=712-2450AT18D0100001ECT-ND, LCSC="Non Stock", Manufacturer="Johanson Technology", Part number IPS=00000001415, Artikkelnr Noca=53059035, Component Class=Antennas, ComponentLink1Description=Datasheet, ComponentLink1URL=N.A., ComponentLink2Description="Supplier link", ComponentLink2URL=N.A., Footprint Doc=2450AT18D0100, HelpURL=http://www.johansontechnology.com/datasheets/antennas/2450AT18D0100.pdf, LatestRevisionDate=2016-06-02, Manufacturer Part Number=2450AT18D0100, Note=N.A., Pad Count=4, PartId=100700005, Part Number="Johanson 2450AT18D0100_STD-R", Published=2016-01-12, Supplier 1=Digi-Key, Supplier 2=Mouser, Supplier Part Number 2=609-2450AT18D0100E
ANT1: Digikey Part Number=2115-NN02-224CT-ND, LCSC="Non Stock"
C1: library part C0402-0.5p-HQ-Murata, "Capacitor, NP0, ±0.05pF, 50V", LCSC=C76912, Package=0402, ComponentLink1Description=Datasheet, ComponentLink1URL=https://search.murata.co.jp/Ceramy/image/img/A01X/G101/ENG/GJM1555C1HR50WB01-01.pdf, ComponentLink2Description="Supplier link", ComponentLink2URL=N.A.
C2: library part C0201-5.5p-HQ-Murata, "Capacitor, NP0, ±0.05pF, 25V", LCSC=C161422, Package=0201, ComponentLink1Description=Datasheet, ComponentLink1URL=N.A., ComponentLink2Description="Supplier link", ComponentLink2URL=N.A.
C3: library part C0201-5.5p-HQ-Murata, "Capacitor, NP0, ±0.05pF, 25V", LCSC=C2187712, Package=0201, ComponentLink1Description=Datasheet, ComponentLink1URL=N.A., ComponentLink2Description="Supplier link", ComponentLink2URL=N.A.
C4: library part C0201-5.5p-HQ-Murata, "Capacitor, NP0, ±0.05pF, 25V", LCSC=C3019008, Package=0201, ComponentLink1Description=Datasheet, ComponentLink1URL=N.A., ComponentLink2Description="Supplier link", ComponentLink2URL=N.A.
C5 C6: library part C0201-15p, "Capacitor, NP0, ±5%, 25V", LCSC=C576456, Package=0402, ComponentLink1Description=Datasheet, ComponentLink1URL=N.A., ComponentLink2Description="Supplier link", ComponentLink2URL=N.A.
C7: library part C0201-5.5p-HQ-Murata, "Capacitor, NP0, ±0.05pF, 25V", LCSC=C565475, Package=0201, ComponentLink1Description=Datasheet, ComponentLink1URL=N.A., ComponentLink2Description="Supplier link", ComponentLink2URL=N.A.
C8: library part C0201-15p, "Capacitor, NP0, ±5%, 25V", LCSC=C524559, Package=0402, ComponentLink1Description=Datasheet, ComponentLink1URL=N.A., ComponentLink2Description="Supplier link", ComponentLink2URL=N.A.
C9: library part C0201-15p, "Capacitor, NP0, ±5%, 25V", Digikey Part Number=490-GJM1555C1H3R7BB01DCT-ND, LCSC=C1855290, Package=0402, ComponentLink1Description=Datasheet, ComponentLink1URL=N.A., ComponentLink2Description="Supplier link", ComponentLink2URL=N.A.
C10 C12 C13: library part C0201-39p, "Capacitor, NP0, ±1%, 25V", LCSC=C3034511, Package=0201, ComponentLink1Description=Datasheet, ComponentLink1URL=N.A., ComponentLink2Description="Supplier link", ComponentLink2URL=N.A.
C11: library part C0201-15p, "Capacitor, NP0, ±5%, 25V", LCSC=C301939, Package=0402, ComponentLink1Description=Datasheet, ComponentLink1URL=N.A., ComponentLink2Description="Supplier link", ComponentLink2URL=N.A.
C14 C20: library part C0201-15p, "Capacitor, NP0, ±5%, 25V", LCSC=C519451, Package=0603, ComponentLink1Description=Datasheet, ComponentLink1URL=N.A., ComponentLink2Description="Supplier link", ComponentLink2URL=N.A.
C15 C17 C21 C59 C60: library part C0201-15p, "Capacitor, NP0, ±5%, 25V", LCSC=C14663, Package=0603, ComponentLink1Description=Datasheet, ComponentLink1URL=N.A., ComponentLink2Description="Supplier link", ComponentLink2URL=N.A.
C16 C22: library part C0805-47µ-10V, "Capacitor, X5R, ±20%, 10V", LCSC=C124129, Package=0805, ComponentLink1Description=Datasheet, ComponentLink1URL=https://search.murata.co.jp/Ceramy/image/img/A01X/G101/ENG/GRM21BR61A476ME15-01A.pdf, ComponentLink2Description="Supplier link", ComponentLink2URL=N.A.
C18 C19: library part C0201-15p, "Capacitor, NP0, ±5%, 25V", LCSC=C2961288, Package=0603, ComponentLink1Description=Datasheet, ComponentLink1URL=N.A., ComponentLink2Description="Supplier link", ComponentLink2URL=N.A.
C23: library part C0201-15p, "Capacitor, NP0, ±5%, 25V", LCSC=C1525, Package=0402, ComponentLink1Description=Datasheet, ComponentLink1URL=N.A., ComponentLink2Description="Supplier link", ComponentLink2URL=N.A.
C26 C31: library part C0402-1µ0, "Capacitor, X5R, ±5%, 6.3V", LCSC=C52923, Package=0402, ComponentLink1Description=Datasheet, ComponentLink1URL=N.A., ComponentLink2Description="Supplier link", ComponentLink2URL=N.A.
C27 C28: library part C0402-1µ0, "Capacitor, X5R, ±5%, 6.3V", LCSC=C482487, Package=0402, ComponentLink1Description=Datasheet, ComponentLink1URL=N.A., ComponentLink2Description="Supplier link", ComponentLink2URL=N.A.
C29 C30 C40 C41 C42: library part C0402-1µ0, "Capacitor, X5R, ±5%, 6.3V", LCSC=C513772, Package=0402, ComponentLink1Description=Datasheet, ComponentLink1URL=N.A., ComponentLink2Description="Supplier link", ComponentLink2URL=N.A.
C32: library part C0402-1µ0, "Capacitor, X5R, ±5%, 6.3V", LCSC=C5120795, Package=0402, ComponentLink1Description=Datasheet, ComponentLink1URL=N.A., ComponentLink2Description="Supplier link", ComponentLink2URL=N.A.
C33: library part C0201-1.0p, "Capacitor, NP0, ±0.05pF, 50V", LCSC=C88903, Manufacturer=N.A., Part number IPS=00000001247, Artikkelnr Noca=N.A., Component Class=Capacitors, ComponentLink1Description=Datasheet, ComponentLink1URL=N.A., ComponentLink2Description="Supplier link", ComponentLink2URL=N.A., Footprint Doc=0201, HelpURL=N.A., LatestRevisionDate=2018-10-22, Manufacturer Part Number=N.A., Note=50V, Pad Count=2, PartId=100200014, Part Number=C0201-1.0p, Published=2014-11-13, Supplier 1=N.A., Supplier 2=N.A., Supplier Part Number 1=N.A., Supplier Part Number 2=N.A.
C34: library part C0201-1.0p, "Capacitor, NP0, ±0.05pF, 50V", LCSC=C1551, Manufacturer=N.A., Part number IPS=00000001247, Artikkelnr Noca=N.A., Component Class=Capacitors, ComponentLink1Description=Datasheet, ComponentLink1URL=N.A., ComponentLink2Description="Supplier link", ComponentLink2URL=N.A., Footprint Doc=0201, HelpURL=N.A., LatestRevisionDate=2018-10-22, Manufacturer Part Number=N.A., Note=50V, Pad Count=2, PartId=100200014, Part Number=C0201-1.0p, Published=2014-11-13, Supplier 1=N.A., Supplier 2=N.A., Supplier Part Number 1=N.A., Supplier Part Number 2=N.A.
C35: library part C0201-0.7p-HQ-Murata, "Ceramic Capacitor C0G, NP0 0201, ±0.1pF 25V", LCSC=NILL, Package=0402, ComponentLink1Description=Datasheet, ComponentLink1URL=https://search.murata.co.jp/Ceramy/image/img/A01X/G101/ENG/GJM0335C1ER70BB01-01.pdf, ComponentLink2Description="Supplier link", ComponentLink2URL=https://www.murata.com/en-eu/products/productdetail?partno=GJM0335C1ER70BB01%23
C36: library part C0201-0.7p-HQ-Murata, "Ceramic Capacitor C0G, NP0 0201, ±0.1pF 25V", LCSC=NILL, Package=0201, ComponentLink1Description=Datasheet, ComponentLink1URL=https://search.murata.co.jp/Ceramy/image/img/A01X/G101/ENG/GJM0335C1ER70BB01-01.pdf, ComponentLink2Description="Supplier link", ComponentLink2URL=https://www.murata.com/en-eu/products/productdetail?partno=GJM0335C1ER70BB01%23
C37: library part C0402-1µ0, "Capacitor, X5R, ±5%, 6.3V", LCSC=C565563, Package=0402, ComponentLink1Description=Datasheet, ComponentLink1URL=N.A., ComponentLink2Description="Supplier link", ComponentLink2URL=N.A.
C38: library part C0402-1µ0, "Capacitor, X5R, ±5%, 6.3V", LCSC=C274416, Package=0402, ComponentLink1Description=Datasheet, ComponentLink1URL=N.A., ComponentLink2Description="Supplier link", ComponentLink2URL=N.A.
C43: library part Cap, "Capacitor", LCSC=C21120, Package=0603
C44: library part Cap, "Capacitor", LCSC=C394395, Package=1210
C45 C46: library part C0201-15p, "Capacitor, NP0, ±5%, 25V", LCSC=C386081, Package=0603, ComponentLink1Description=Datasheet, ComponentLink1URL=N.A., ComponentLink2Description="Supplier link", ComponentLink2URL=N.A.
C48 C57: library part Cap, "Capacitor", LCSC=C109456, Package=0603
C49 C50: library part Cap, "Capacitor", LCSC=C129621, Package=0603
C51 C52 C53: library part Cap, "Capacitor", LCSC=C16780, Package=0805
C58: library part Cap, "Capacitor", LCSC=C21122, Package=0603
CON1: "3A USB 3.1 1 260? Surface Mount 16 Female -40?~+85? Gold plating High Conductivity Copper Type-C SMD USB Connectors ROHS", LCSC=C2997432
CR1: "ESD Suppressor, 30V, 0.04pF", Digikey Part Number=P122037CT-ND, LCSC="Not Available", Manufacturer=Panasonic, Part number IPS=00000004437, Artikkelnr Noca=N.A., Component Class=Semiconductors, ComponentLink1Description=Datasheet, ComponentLink1URL=https://industrial.panasonic.com/cdbs/www-data/pdf/AWD0000/AWD0000C13.pdf, ComponentLink2Description="Supplier link", ComponentLink2URL=N.A., Footprint Doc=0201, HelpURL=N.A., LatestRevisionDate=2020-04-28, Manufacturer Part Number=EZA-EG1N50AC, Note=N.A., Pad Count=2, PartId=101300173, Part Number=EZA-EG1N50AC, Published=2020-02-06, Supplier 1=Digi-Key, Supplier 2=N.A., Supplier Part Number 2=N.A.
D1: "20V schottky barrier diode, Vf 350 mV @ 100 mA, Ir 2.0 µA @ 10 V, If 500 mA", LCSC=C91106, Manufacturer="ON Semiconductor", Package=SOD-923, Part number IPS=00000009952, Supplier Part Number 1=NSR0620P2T5GOSCT-ND, Artikkelnr Noca=10029169, Component Class=Semiconductors, ComponentLink1Description=Datasheet, ComponentLink1URL=N.A., ComponentLink2Description="Supplier link", ComponentLink2URL=N.A., HelpURL=http://www.onsemi.com/pub_link/Collateral/NSR0620P2-D.PDF, LatestRevisionDate=2016-07-07, Manufacturer Part Number=NSR0620P2T5G, Note=N.A., Pad Count=2, PartId=101300131, Part Number=NSR0620P2T5G, Published=2016-07-07, Supplier 1=Digi-Key, Supplier 2=N.A., Supplier Part Number 2=N.A.
D2: library part "D Schottky", "Schottky Diode", LCSC=C22452
F1: "2.4 GHz BPF", LCSC=C910680, Manufacturer=Murata, Part number IPS="00000001784, 80000001660", Supplier Part Number 1=N.A., Artikkelnr Noca=N.A., Component Class=Filters, ComponentLink1Description=Datasheet, ComponentLink1URL=N.A., ComponentLink2Description="Supplier link", ComponentLink2URL=N.A., Footprint Doc=1109, HelpURL=N.A., LatestRevisionDate=2018-05-15, Manufacturer Part Number=SAFFB2G45MA0F0A, Note=N.A., Pad Count=5, PartId=100800023, Part Number=SAFFB2G45MA0F0A, Published=2018-05-15, Supplier 1=N.A., Supplier 2=N.A., Supplier Part Number 2=N.A.
FB1: library part FB0402-120R@100M-700mA, "Ferrite Bead, 120 Ohm @ 100MHz, 700mA, 130 mOhm Max", LCSC=C337873, Manufacturer=Murata, Manufacturer Part Number=BLM15AX121SN1, Package=0402, Part number IPS=00000004487, Supplier Part Number 1=490-5439-1-ND, Artikkelnr Noca=N.A., Component Class=Inductors, ComponentLink1Description=Datasheet, ComponentLink1URL=https://www.murata.com/en-us/products/productdata/8796740059166/ENFA0018.pdf, ComponentLink2Description="Supplier link", ComponentLink2URL=N.A., HelpURL=https://www.murata.com/products/productdetail?partno=BLM15AX121SN1%23, LatestRevisionDate=2020-04-28, Note=N.A., Pad Count=2, PartId=100300100, Part Number=FB0402-120R@100M-700mA, Published=2020-04-28, Supplier 1=Digi-Key, Supplier 2=N.A., Supplier Part Number 2=N.A.
J1: library part 20279-001E-03, "Ultraminiature Coaxial Connector, 50 Ohm, SMD", Digikey Part Number=H11891CT-ND, LCSC=NILL, ComponentLink1Description=Datasheet, ComponentLink1URL=\\hizz\pro\app9717\Datasheet\connectors\Wellshow\20279C18.pdf, ComponentLink2Description="Supplier link", ComponentLink2URL=N.A.
J2: library part MM8130-2600, "Coaxial Connector with Switch", LCSC=C167503, ComponentLink1Description=Datasheet, ComponentLink1URL=N.A., ComponentLink2Description="Supplier link", ComponentLink2URL=N.A.
J3: library part SM03B-SRSS-TB, "1.0mm pitch connector side entry SMD", LCSC=C160403, ComponentLink1Description=Datasheet, ComponentLink1URL=N.A., ComponentLink2Description="Supplier link", ComponentLink2URL=N.A.
J5: "NanoSIM SMD SIM Card Connectors", Alternate Part Number=SIM8066-6-1-14-01-A, LCSC=C266888, Manufacturer=XUNPU, Manufacturer Part Number=SMN-303, Supplier 1=LCSC
L1: library part L0603-15n-Wirewound-Murata, "Inductor, 700mA, ±5%, 85mO, Q=42 @ 250MHz", LCSC=C341693, Package=0603, ComponentLink1Description=Datasheet, ComponentLink1URL=https://search.murata.co.jp/Ceramy/image/img/P02/JELF243A-0026.pdf, ComponentLink2Description="Supplier link", ComponentLink2URL=N.A.
L2: library part L0201-6n2-Wirewound-Murata, "Inductor, 360mA, ±5%, 220mOhm, Q=39", LCSC=NILL, Package=0201, ComponentLink1Description=Datasheet, ComponentLink1URL=https://search.murata.co.jp/Ceramy/image/img/P02/JELF243A-0109.pdf, ComponentLink2Description="Supplier link", ComponentLink2URL=N.A.
L3: library part L0201-6n2-Wirewound-Murata, "Inductor, 360mA, ±5%, 220mOhm, Q=39", LCSC=C142508, Package=0201, ComponentLink1Description=Datasheet, ComponentLink1URL=https://search.murata.co.jp/Ceramy/image/img/P02/JELF243A-0109.pdf, ComponentLink2Description="Supplier link", ComponentLink2URL=N.A.
L4: library part L0201-6n2-Wirewound-Murata, "Inductor, 360mA, ±5%, 220mOhm, Q=39", LCSC=C162624, Package=0201, ComponentLink1Description=Datasheet, ComponentLink1URL=https://search.murata.co.jp/Ceramy/image/img/P02/JELF243A-0109.pdf, ComponentLink2Description="Supplier link", ComponentLink2URL=N.A.
L5: library part L0201-6n2-Wirewound-Murata, "Inductor, 360mA, ±5%, 220mOhm, Q=39", LCSC=C237443, Package=0201, ComponentLink1Description=Datasheet, ComponentLink1URL=https://search.murata.co.jp/Ceramy/image/img/P02/JELF243A-0109.pdf, ComponentLink2Description="Supplier link", ComponentLink2URL=N.A.
L6: library part L0603-8n2-Wirewound-Murata, "Inductor, 800mA, ±0.5nH, 58mO, Q=38 @ 250MHz", LCSC=C98087, Manufacturer=Murata, Manufacturer Part Number=LQW18AN8N2D10, Package=0603, Part number IPS=00000003972, Supplier Part Number 1=490-6914-1-ND, Artikkelnr Noca=N.A., Component Class=Inductors, ComponentLink1Description=Datasheet, ComponentLink1URL=https://search.murata.co.jp/Ceramy/image/img/P02/JELF243A-0026.pdf, ComponentLink2Description="Supplier link", ComponentLink2URL=N.A., HelpURL=https://psearch.en.murata.com/inductor/product/LQW18AN8N2D10%23.html, LatestRevisionDate=2019-10-25, Note="-55°C ~ 125°C", Pad Count=2, PartId=100300394, Part Number=L0603-8n2-Wirewound-Murata, Published=2019-10-25, Supplier 1=Digi-Key, Supplier 2=N.A., Supplier Part Number 2=N.A.
L7: library part L0201-6n2-Wirewound-Murata, "Inductor, 360mA, ±5%, 220mOhm, Q=39", Digikey Part Number=490-LQW18AN11NG80DCT-ND, LCSC="Non Stock", Package=0603, ComponentLink1Description=Datasheet, ComponentLink1URL=https://search.murata.co.jp/Ceramy/image/img/P02/JELF243A-0109.pdf, ComponentLink2Description="Supplier link", ComponentLink2URL=N.A.
L8: library part L0201-6n2-Wirewound-Murata, "Inductor, 360mA, ±5%, 220mOhm, Q=39", LCSC=C412266, Package=0402, ComponentLink1Description=Datasheet, ComponentLink1URL=https://search.murata.co.jp/Ceramy/image/img/P02/JELF243A-0109.pdf, ComponentLink2Description="Supplier link", ComponentLink2URL=N.A.
L9: library part L0402-68n-Wirewound-Murata, "Inductor, 140mA, ±2%, 1960mO, Q=20", LCSC=C108965, Package=0402, ComponentLink1Description=Datasheet, ComponentLink1URL=https://search.murata.co.jp/Ceramy/image/img/P02/JELF243A-0050.pdf, ComponentLink2Description="Supplier link", ComponentLink2URL=N.A.
L12: library part L0201-3n9, "Inductor, 400mA, ±0.1nH", LCSC=C90191, Manufacturer=Murata, Manufacturer Part Number=LQP03TN3N9B02D, Part number IPS=00000001253, Supplier Part Number 1=N.A., Artikkelnr Noca=N.A., Component Class=Inductors, ComponentLink1Description=Datasheet, ComponentLink1URL=N.A., ComponentLink2Description="Supplier link", ComponentLink2URL=N.A., Footprint Doc=0201, HelpURL=N.A., LatestRevisionDate=2017-11-09, Note=N.A., Pad Count=2, PartId=100300022, Part Number=L0201-3n9, Published=2013-04-10, Supplier 1=N.A., Supplier 2=N.A., Supplier Part Number 2=N.A.
L13: library part L0201-4n7, "Inductor, 350mA, ±3%", LCSC=C86126, Package=0201, ComponentLink1Description=Datasheet, ComponentLink1URL=N.A., ComponentLink2Description="Supplier link", ComponentLink2URL=N.A.
L15: library part Inductor, "3.3A 3.3uH ±20% 3.3A SMD,5.2x5.8x4.5mm Power Inductors ROHS", LCSC=C2903681
LED1: library part LTST-C19HE1WT, LCSC=C458749
P1: library part "Pin Header 2x5 SMD, 1.27mm, Angled", "Pin Header 2x5, 1.27mm (50mil)", LCSC=C5160761, Manufacturer=W-CON, Manufacturer Part Number=1325B-1205S0Z080CR02, Part number IPS=00000007800, Artikkelnr Noca=N.A., Component Class=Connectors, ComponentLink1Description=Datasheet, ComponentLink1URL=N.A., ComponentLink2Description="Supplier link", ComponentLink2URL=N.A., Footprint Doc=HDR_2x5-SMD-1.27mm-ANG, HelpURL=\\hizz\pro\app9717\Datasheet\connectors\W-CON\1325B-12XXXXZXXXCXXX.pdf, LatestRevisionDate=2019-11-20, Note=N.A., Pad Count=10, PartId=100500257, Part Number="Pin Header 2x5 SMD, 1.27mm, Angled", Published=2014-01-22, Supplier 1=Cabcon, Supplier 2=Samtec, Supplier Part Number 1=1325B-1205S0Z080CR02, Supplier Part Number 2=FTSH-105-01-L-DH-A-C-TR
Q1 Q2 Q3: library part NMOS-2, "30V 5.8A 35mO@10V,5.8A 350mW N Channel SOT-23 MOSFETs ROHS", LCSC=C181090, ComponentLink1Description="Manufacturer Link", ComponentLink1URL=http://www.irf.com/
Q4: library part PMOS-2, "P-Channel Power MOSFET", LCSC=C6903, ComponentLink1Description="Manufacturer Link", ComponentLink1URL=http://www.irf.com/
R1: library part R0201-0R, "Resistor, ±5%, 0.05W", LCSC=C716999, Package=0201, ComponentLink1Description=Datasheet, ComponentLink1URL=N.A., ComponentLink2Description="Supplier link", ComponentLink2URL=N.A.
R2 R4 R5 R6 R10 R11 R12: library part R0201-10k, "Resistor, ±1%, 0.05W", LCSC=C25744, Package=0402, ComponentLink1Description=Datasheet, ComponentLink1URL=N.A., ComponentLink2Description="Supplier link", ComponentLink2URL=N.A.
R3 R22 R23 R24 R29 R34 R35: library part R0201-10k, "Resistor, ±1%, 0.05W", LCSC=C25741, Package=0402, ComponentLink1Description=Datasheet, ComponentLink1URL=N.A., ComponentLink2Description="Supplier link", ComponentLink2URL=N.A.
R7 R8 R9 R14 R15 R16: library part R0201-10k, "Resistor, ±1%, 0.05W", LCSC=C160493, Package=0402, ComponentLink1Description=Datasheet, ComponentLink1URL=N.A., ComponentLink2Description="Supplier link", ComponentLink2URL=N.A.
R13: library part R0201-10k, "Resistor, ±1%, 0.05W", LCSC=C11702, Package=0402, ComponentLink1Description=Datasheet, ComponentLink1URL=N.A., ComponentLink2Description="Supplier link", ComponentLink2URL=N.A.
R18: library part R0201-2R2, "Resistor, ±1%, 0.05W", LCSC=C100147, Package=0201, ComponentLink1Description=Datasheet, ComponentLink1URL=N.A., ComponentLink2Description="Supplier link", ComponentLink2URL=N.A.
R19 R21: library part R0201-10k, "Resistor, ±1%, 0.05W", LCSC=C25087, Package=0402, ComponentLink1Description=Datasheet, ComponentLink1URL=N.A., ComponentLink2Description="Supplier link", ComponentLink2URL=N.A.
R20: library part R0201-10k, "Resistor, ±1%, 0.05W", LCSC=C25102, Package=0402, ComponentLink1Description=Datasheet, ComponentLink1URL=N.A., ComponentLink2Description="Supplier link", ComponentLink2URL=N.A.
R25 R26: library part Res1, "Resistor", LCSC=C103211, Package=0603
R27: library part Res1, "Resistor", LCSC=C5123603, Package=0805
R28: library part Res1, "Resistor", LCSC=C22978, Package=0603
R30: library part Res1, "Resistor", LCSC=C4328, Package=0805
R31: library part Res1, "Resistor", LCSC=C23046, Package=0603
R32 R33: library part Res1, "Resistor", LCSC=C144111
SW1: library part AYZ0102AGRLC, "Miniature slide switch, SPDT, Right-Angle, ON-ON, 12V, 100mA", Digikey Part Number=401-2012-1-ND, LCSC=C92658, ComponentLink1Description=Datasheet, ComponentLink1URL=https://www.ckswitches.com/media/1431/ayz.pdf, ComponentLink2Description="Supplier link", ComponentLink2URL=N.A.
TP1: library part TP_SMD_Ø1.0MM, "1.0mm circular SMD testpad", Manufacturer="Nordic Semiconductor", Manufacturer Part Number=N.A., Artikkelnr Noca=N.A., Component Class=Connectors, ComponentLink1Description=Datasheet, ComponentLink1URL=N.A., ComponentLink2Description="Supplier link", ComponentLink2URL=N.A., Footprint Doc=TP_SMD_Ø1.0mm, HelpURL=N.A., LatestRevisionDate=2013-06-11, Note=N.A., Pad Count=1, PartId=100500475, Part Number=TP_SMD_Ø1.0MM, Part number IPS=N.A., Published=2013-06-11, Supplier 1=N.A., Supplier 2=N.A., Supplier Part Number 1=N.A., Supplier Part Number 2=N.A.
U1 U2: library part QM12038, "SP8T Switch For 3G/4G Applications", LCSC=C150871, Package=QFN-14, ComponentLink1Description=Datasheet, ComponentLink1URL="\\hizz\pro\app9717\Datasheet\integated circuits\qorvo\QM12038 Datasheet.pdf", ComponentLink2Description="Supplier link", ComponentLink2URL=N.A.
U3: library part BGA524N6E6327XTSA1, "GPS/GNSS Low-Noise Amplifier, 19.6dB Gain, 0.55dB Noise Figure, 1.5V to 3.3V Supply Range", Digikey Part Number=BGA524N6E6327XTSA1CT-ND, LCSC=C534158, Manufacturer="Infineon Technologies", Package=XFDFN-6, Part number IPS=00000004011, Component Class=Misc_ICs, ComponentLink1Description=Datasheet, ComponentLink1URL=https://www.infineon.com/dgdl/Infineon-BGA524N6-DS-v03_00-en.pdf?fileId=db3a304344e406b50144e44dfad302b9, ComponentLink2Description="Supplier link", ComponentLink2URL=N.A., HelpURL=https://www.infineon.com/cms/en/product/rf-wireless-control/low-noise-amplifier-lna-ics/gps-glonass-compass-lna/bga524n6/, LatestRevisionDate=2019-10-25, Manufacturer Part Number=BGA524N6E6327XTSA1, Note=N.A., Pad Count=6, PartId=101900596, Published=2019-10-25, Supplier Part Number 1=BGA524N6E6327XTSA1CT-ND, Supplier Part Number 2=726-A524N6E6327XTSA1
U4: "Low power System-in-Package with integrated LTE-M/NB-IoT modem and GPS", Digikey Part Number=4823-NRF9160-SICA-B1A-RCT-ND, LCSC=NILL, Manufacturer="Nordic Semiconductor", Part number IPS=80000002329, Artikkelnr Noca=N.A., Component Class=nRF_Devices, ComponentLink1Description=Datasheet, ComponentLink1URL=N.A., ComponentLink2Description="Supplier link", ComponentLink2URL=N.A., Footprint Doc=LGA-161, HelpURL=N.A., LatestRevisionDate=2020-08-13, Manufacturer Part Number=nRF9160-SICAB1A, Note=N.A., Pad Count=161, PartId=102000165, Part Number=nRF9160-SICAB1A, Published=2020-08-13, Supplier 1="Nordic Semiconductor", Supplier 2=N.A., Supplier Part Number 1=nRF9160-SICAB1A, Supplier Part Number 2=N.A.
U7: "AQFN-73-EP(7x7) RF Transceiver ICs ROHS", LCSC=C190794, Package=QFN-73
U8: LCSC=C2873462